# Altium PCB V.PcbDoc
Units mm, origin at the board's own origin, x right, y up, seen from the top; angles counter-clockwise.
Board outline 20.95 x 17.14 mm, 2 copper layers (Top Layer, Bottom Layer); 21 components, 0 nets, 45 pads, 6 vias.
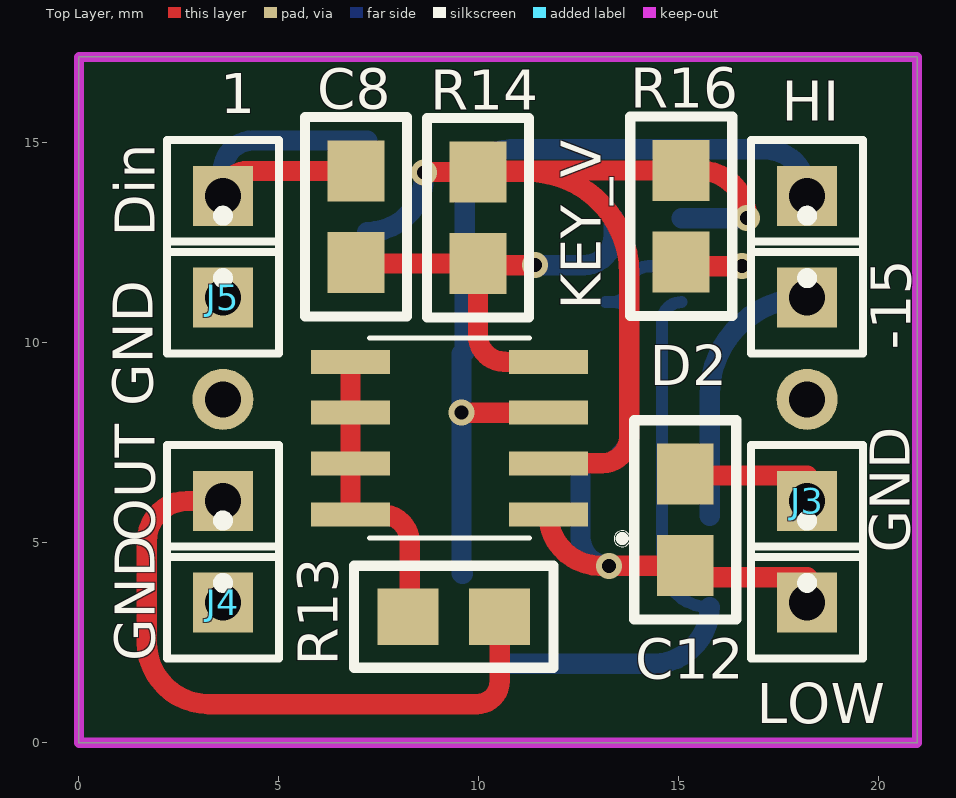
[diagram p0: Top Layer view]
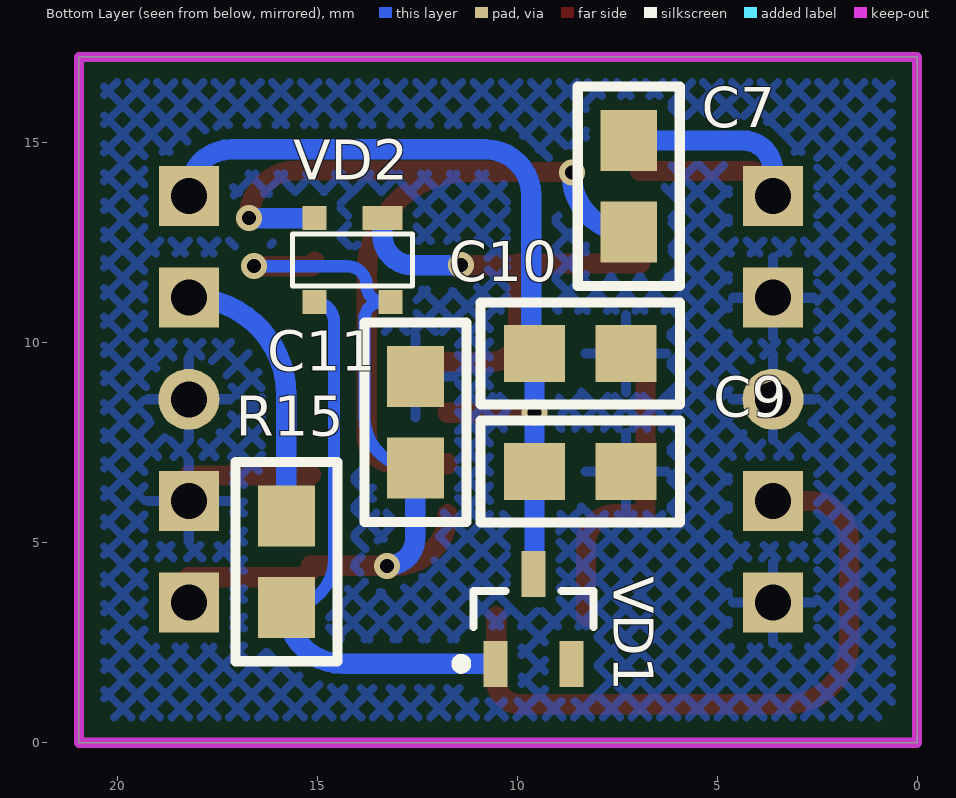
[diagram p1: Bottom Layer view, seen from below]

## Layer stack, top to bottom
Top Solder: solder mask 0.0102, Solder Resist, Dk 3.5
Top Layer: signal copper 0.0356
Dielectric 1: dielectric 0.32, FR-4, Dk 4.8
Bottom Layer: signal copper 0.0356
Bottom Solder: solder mask 0.0102, Solder Resist, Dk 3.5

## Board outline
0,0 20.955,0 20.955,17.145 0,17.145

## Design rules (kind name [scope] priority, off if disabled: settings)
Clearance [All] p1: gap=0.254
PolygonConnect [All] p1: connectstyle=Relief reliefconductorwidth=0.254 reliefentries=4 polygonreliefangle="90 Angle" airgapwidth=0.254
RoutingVias [All] p1: holewidth=0.711 width=1.27 viastyle="Through Hole" minholewidth=0.711 minwidth=1.27 maxholewidth=0.711 maxwidth=1.27
SolderMaskExpansion [All] p1: expansion=0.102
Width [All] p1: maxlimit=0.254 minlimit=0.254 preferedwidth=0.254
29 further rules are at their usual default settings.

## Components (designator, comment, footprint, x,y, rotation, side; value= is the part's Value field where it differs from the comment)
-15 "" PIN1 18.207,11.124 r0 top
C7 "0.1" CAP_SMALL 5.938,11.404 r90 bottom
C8 "0.1" CAP_SMALL 8.199,10.642 r90 top
C9 "4.7" CAP_SMALL 5.913,8.051 r0 bottom
C10 "0.1" CAP_SMALL 5.913,10.997 r0 bottom
C11 "4.7" CAP_SMALL 13.812,10.515 r270 bottom
C12 "0.1" CAP_SMALL 13.889,8.076 r270 top
D2 "IRF7309" SOIC127P600X175-8N 9.266,7.614 r180 top
Din "" PIN1 3.602,13.664 r180 top
HI "" PIN1 18.207,13.664 r180 top (schematic designator V_HIGH)
J3 "GND1" PIN1 18.207,6.044 r180 top
J4 "GND1" PIN1 3.602,3.504 r0 top
J5 "GND1" PIN1 3.602,11.124 r0 top
LOW "" PIN1 18.207,3.504 r0 top (schematic designator V_LOW)
OUT "" PIN1 3.602,6.044 r180 top
R13 "3" RES 11.857,1.904 r90 top
R14 "100k" RES 8.732,10.642 r0 top
R15 "10k" RES 14.524,7.01 r0 bottom
R16 "10k" RES 16.302,15.646 r180 top
VD1 "MMBZ5229" SOT-23_N 9.596,3.098 r90 bottom
VD2 "HSMS2805" SOT-143B 14.117,12.064 r0 bottom

## Footprints (in the part's own frame and the unit in brackets; to place one, negate y for a bottom-side part, rotate by r counter-clockwise, add the part's x,y. Pads: shape width x height; smd on the part's side, far side on the other; paste and mask are expansions set on the pad)
CAP_SMALL [mil] "FROM_MAX"
  rect 60x55.98 smd: 1(53.71,50) 2(143.71,50)
  silkscreen extent 1,0 197,100, body extent 20,18 178,82, height 100
PIN1 [mm] "Connector; Plug"
  rect 1.5x1.5 hole 0.9: 1(0,0)
  silkscreen extent -1.4,-1.4 1.4,2.17
RES [mil] "FROM_MAX"
  rect 55.98x60 smd: 1(49,52.71) 2(49,142.71)
  silkscreen extent -1,0 99,196, body extent 17,19 81,177, height 100
SOIC127P600X175-8N [mm]
  rect 1.97x0.6 smd: 1(-2.475,1.905) 2(-2.475,0.635) 3(-2.475,-0.635) 4(-2.475,-1.905) 5(2.475,-1.905) 6(2.475,-0.635) 7(2.475,0.635) 8(2.475,1.905)
  silkscreen extent -4.51,-2.5 2,2.71
SOT-23_N [mm] "SOT23, 3-Leads, Body 2.9x1.3mm, Pitch 0.95mm, Lead Span 2.5mm, IPC Medium Density"
  rect 1.15x0.6 smd: 1(-1.125,0.95) 2(-1.125,-0.95) 3(1.125,0)
  silkscreen extent -1.25,-1.5 0.7,1.93, body extent -0.7,-1.5 0.7,1.5, height 1.1
SOT-143B [mm]
  rect 1x0.6 smd: 1(-0.75,-1.05)
  rect 0.6x0.6 smd: 2(0.95,-1.05) 3(0.95,1.05) 4(-0.95,1.05)
  silkscreen extent -1.5,-0.65 1.5,0.65

## Part data
-15 Din HI J3 J4 J5 LOW OUT: library part Socket, "Socket"
C7 C8 C9 C10 C11 C12: library part CAP_SMALL
R13 R14 R15 R16: library part RES
VD1: library part "Diode BAS16", "Silicon Switching Diode for High-Speed Switching"
VD2: library part HSMS-2805

## Free pads (board coordinates)
  round 1.524 hole 0.9: 1(3.602,8.584) 1(18.207,8.584)

## Via types
v1: diameter 0.65, hole 0.35, Top Layer to Bottom Layer, 6 vias

## Nets (pads, with @x,y where several pads share a name; then routed paths per layer and width w, separated by ;. In a path a pad name is that pad's centre, name@x,y a point inside that pad or via, vN(x,y) a via of type N, cw(c..) or ccw(c..) an arc to the next point about the centre after c; other vN are vias at no path point)
pads on no net: -15.1 C7.1 C7.2 C8.1 C8.2 C9.1 C9.2 C10.1 C10.2 C11.1 C11.2 C12.1 C12.2 D2.1 D2.2 D2.3 D2.4 D2.5 D2.6 D2.7 D2.8 Din.1 HI.1 J3.1 J4.1 J5.1 LOW.1 OUT.1 R13.1 R13.2 R14.1 R14.2 R15.1 R15.2 R16.1 R16.2 VD1.1 VD1.2 VD1.3 VD2.1 VD2.2 VD2.3 VD2.4
copper on no net: | length 135.5
  Top Layer w0.508: 3.602,6.044 2.713,6.044 ccw(c2.713,5.028) 1.697,5.028 1.697,2.514 ccw(c3.246,2.514) 3.246,0.964 9.952,0.964 ccw(c9.952,1.531) 10.518,1.531 10.518,3.149 ; 3.602,13.664 cw(c4.229,13.664) 4.229,14.292 6.929,14.292 6.929,14.299 ; 6.791,9.519 6.791,8.249 6.791,6.979 6.791,5.709 7.569,5.709 cw(c7.569,5.003) 8.275,5.003 8.275,3.192 cw(c8.232,3.192) 8.232,3.149 ; 6.929,12.006 ccw(c6.954,12.006) 6.954,11.981 9.977,11.981 ; v1@8.58,14.299 8.613,14.267 9.977,14.267 ; v1(9.571,8.249) 11.741,8.249 ; v1(11.399,11.937) 10.02,11.937 cw(c10.02,11.981) 9.977,11.981 ; 11.741,5.709 ccw(c13.024,5.709) 13.024,4.426 15.159,4.426 ccw(c15.445,4.426) 15.445,4.139 18.207,4.139 ; 11.741,9.524 11.741,9.519 10.637,9.519 10.637,9.524 cw(c10.637,10.185) 9.977,10.185 9.977,11.981 ; 11.761,6.959 cw(c11.761,6.979) 11.741,6.979 11.741,6.984 13.076,6.984 ccw(c13.076,7.67) 13.762,7.67 13.762,11.727 ccw(c11.222,11.727) 11.222,14.267 9.977,14.267 ; 15.057,12.021 ccw(c15.166,12.021) 15.166,11.912 v1(16.581,11.912) ; 15.159,6.712 ccw(c15.191,6.712) 15.191,6.679 18.207,6.679 ; v1@16.708,13.106 ccw(c15.507,13.106) 15.507,14.307 15.057,14.307 10.017,14.307 ccw(c10.017,14.267) 9.977,14.267
  Bottom Layer w0.305: 12.542,6.865 ccw(c12.542,8.135) 13.812,8.135 13.812,10.591 ccw(c13.389,10.591) 13.389,11.014 13.347,11.014 ; 13.167,11.014 13.347,11.014 ; 15.067,11.014 ccw(c15.067,10.521) 14.574,10.521 14.574,4.579 ccw(c15.768,4.579) 15.768,3.385 ; v1(16.581,11.912) 14.244,11.912 ccw(c14.244,11.429) 13.762,11.429 cw(c13.347,11.429) 13.347,11.014
  Bottom Layer w0.508: 3.602,13.664 3.602,14.299 cw(c4.356,14.299) 4.356,15.054 7.208,15.054 ; 7.208,12.768 ccw(c7.208,14.19) 8.631,14.19 v1(8.631,14.249) ; 9.596,4.223 cw(c9.596,4.256) 9.563,4.256 9.563,6.781 9.563,9.727 ccw(c9.563,9.811) 9.647,9.811 9.647,13.69 cw(c10.79,13.69) 10.79,14.833 17.14,14.833 cw(c17.14,13.766) 18.207,13.766 18.207,13.664 ; 10.546,1.973 14.356,1.973 ccw(c14.356,3.385) 15.768,3.385 ; v1(11.399,11.937) 12.619,11.937 ccw(c12.619,12.686) 13.367,12.686 13.367,13.114 ; 12.542,6.865 12.542,5.13 ccw(c13.254,5.13) v1(13.254,4.419) ; 15.067,13.114 v1(16.708,13.114) v1@16.708,13.131 ; 15.768,5.671 15.768,8.686 cw(c18.207,8.686) 18.207,11.124

## Polygon pours and split planes (outlines as drawn)
no net on Bottom Layer "Top Layer-No Net" (hatched 45Degree grid 0.508 track 0.203, remove dead copper, pour order 28): 20.32,16.51 0.635,16.51 0.635,0.635 20.32,0.635

## Keep-outs
Keep-Out Layer:
  the board outline again, w0.254

## Silkscreen, mask and mechanical layers (free items; w line width, h text height)
Top Overlay:
  circle w0.254: c13.584,5.105 r0.036
  text "1" at 3.534,15.734 h1
  text "KEY_V" at 13.05,10.82 h1 r90
  text "GND" at 1.849,8.407 h1 r90
  text "GND" at 20.777,4.75 h1 r90
  text "GND" at 1.9,2.031 h1 r90